# Altium PCB Counts_PCB.PcbDoc (part 2 of 3)
Units mil, origin at the board's own origin, x right, y up, seen from the top; angles counter-clockwise.
Board outline 3474.97 x 2159.98 mil, 2 copper layers (Top Layer, Bottom Layer); 185 components, 97 nets, 569 pads, 211 vias.
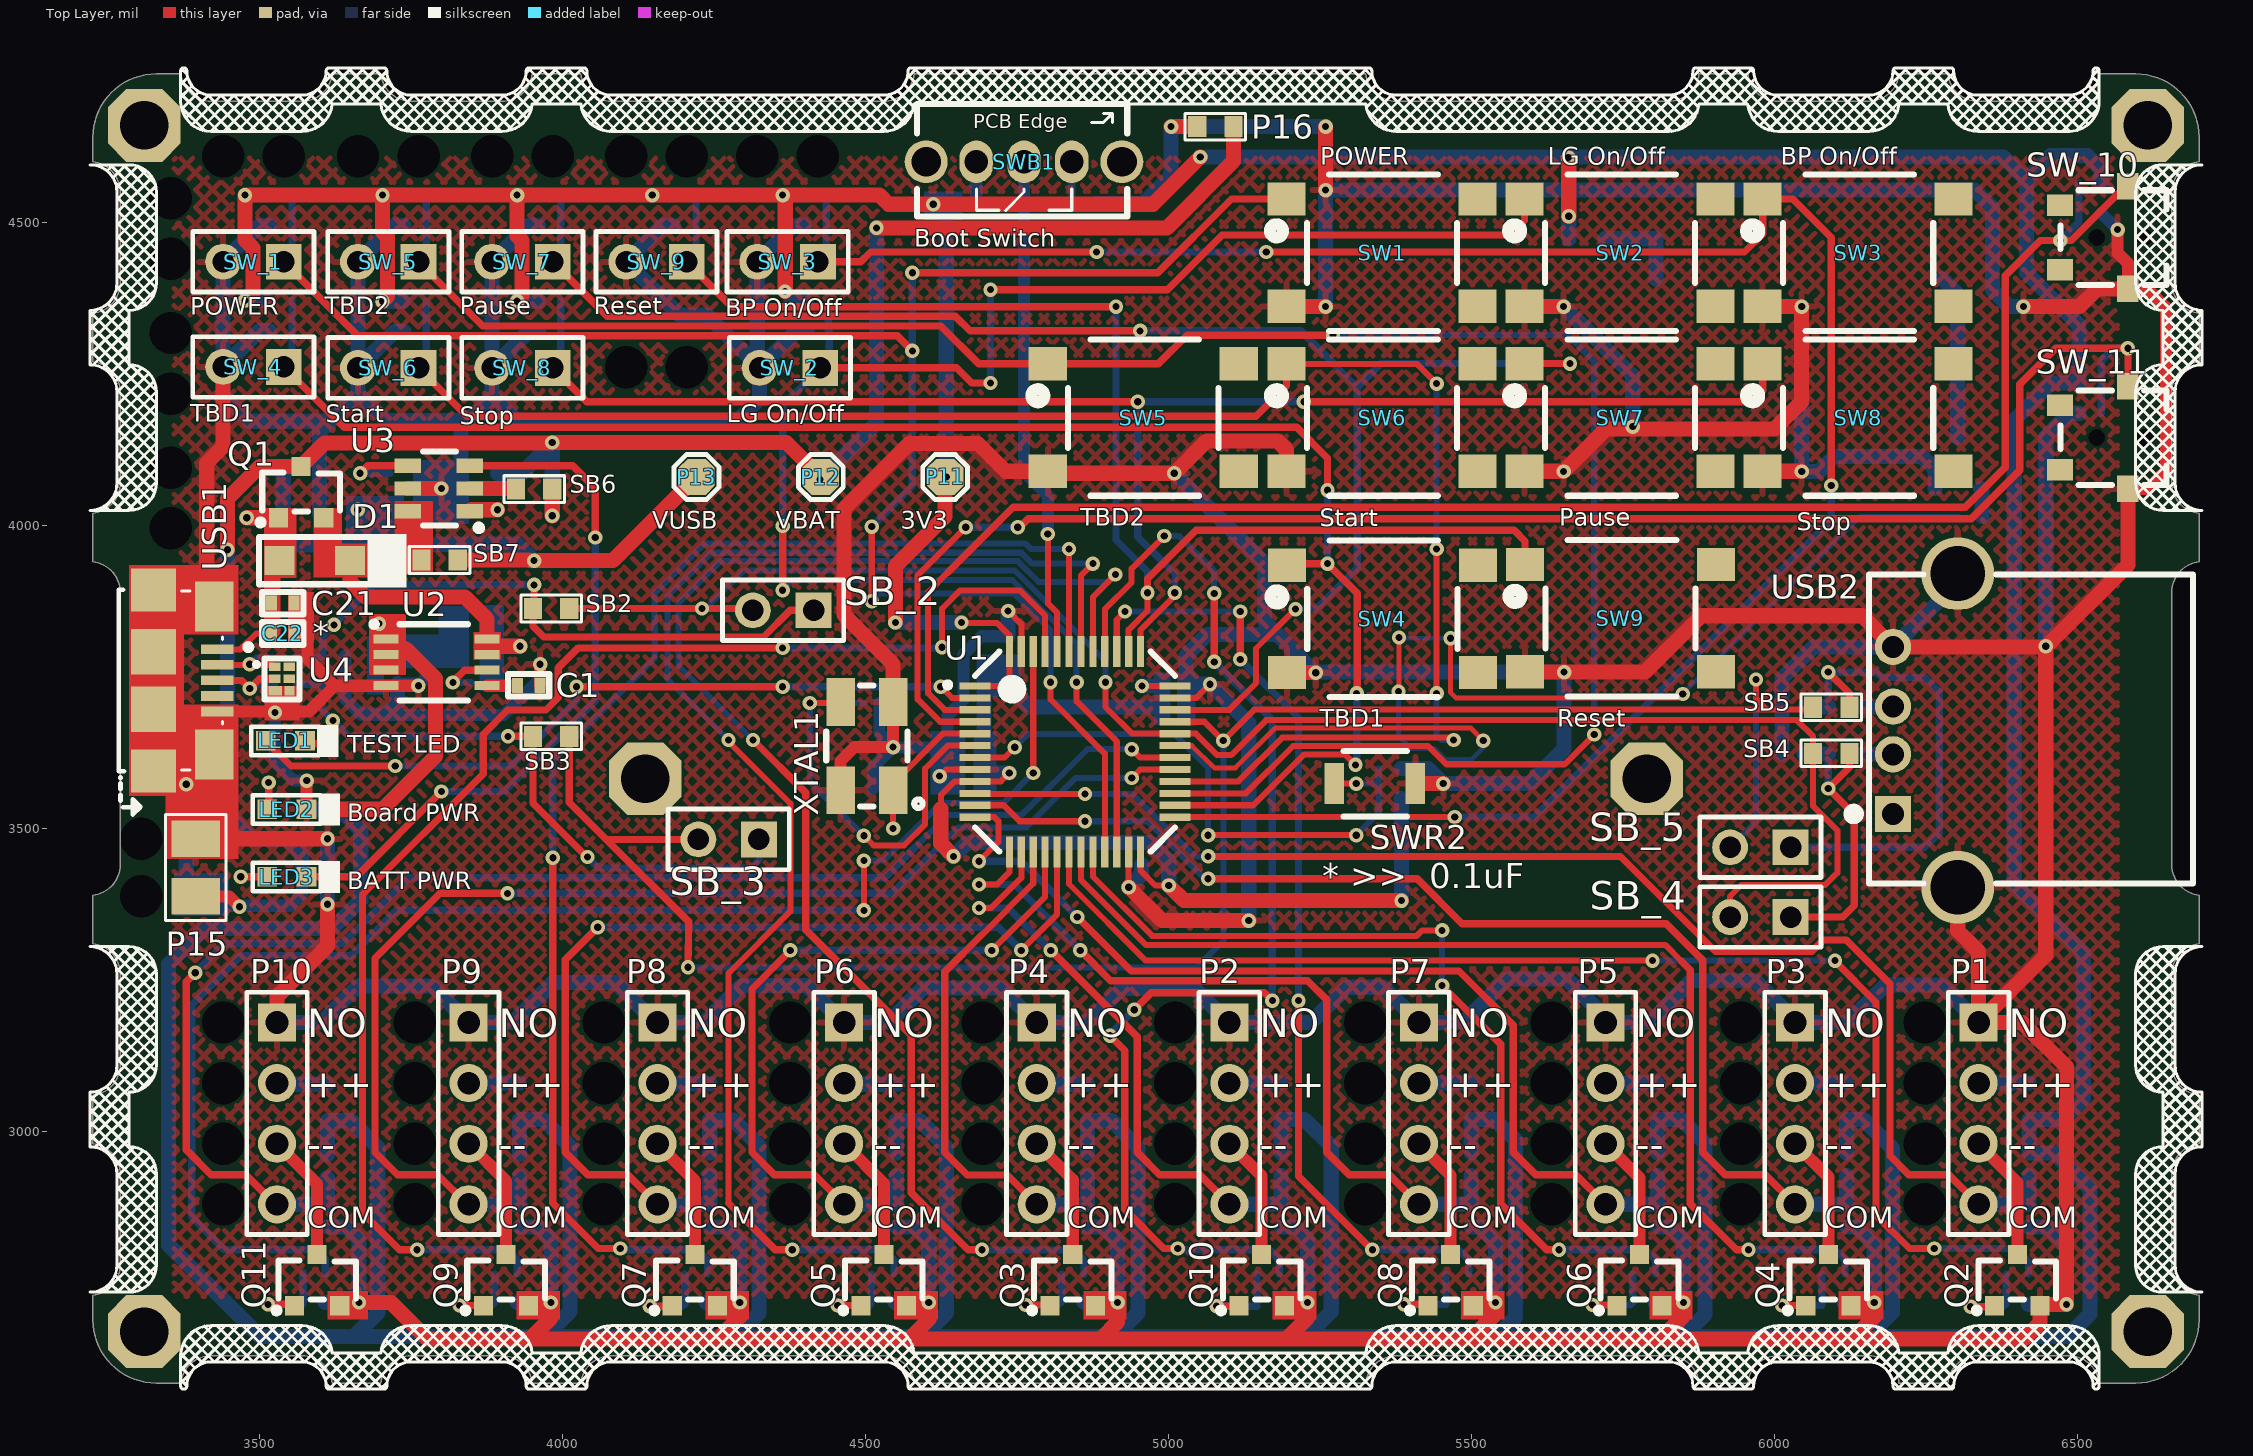
[diagram p0: Top Layer view]

## Part data (continued)
R7 R8 R9: library part RC0402JR-0720KL, "RES SMD 20K OHM 1% 1/16W 0402", Case/Package=0402, Case Code (Metric)=1005, Manufacturer=Yageo, Max Operating Temperature=155°C, Max Power Dissipation=63mW, Min Operating Temperature=-55°C, Package Quantity=1, Power Rating=62.5mW, Resistance=20kR, Supplier Part Number 1=311-20KJRCT-ND, Temperature Coefficient=100ppm/°C, Tolerance=5%, Voltage Rating=50V, Case Code (Imperial)=0402, ComponentLink1Description=https://industrial.panasonic.com/cdbs/www-data/pdf/RDA0000/AOA0000C301.pdf?src-supplier=Future+Electronics, ComponentLink1URL=https://industrial.panasonic.com/cdbs/www-data/pdf/RDA0000/AOA0000C301.pdf?src-supplier=Future+Electronics, ComponentLink2Description=http://www.jameco.com/Jameco/Products/ProdDS/1986781.pdf?src-supplier=Jameco, ComponentLink2URL=http://www.jameco.com/Jameco/Products/ProdDS/1986781.pdf?src-supplier=Jameco, ComponentLink3Description=http://www.farnell.com/datasheets/2059623.pdf?src-supplier=Farnell, ComponentLink3URL=http://www.farnell.com/datasheets/2059623.pdf?src-supplier=Farnell, ComponentLink4Description=http://industrial.panasonic.com/www-data/pdf/AOA0000/AOA0000CE1.pdf?src-supplier=Avnet, ComponentLink4URL=http://industrial.panasonic.com/www-data/pdf/AOA0000/AOA0000CE1.pdf?src-supplier=Avnet, ComponentLink5Description=http://www.alliedelec.com/m/d/51cd0790071e1666bdb9d00c57fcf960.pdf?src-supplier=Allied+Electronics, ComponentLink5URL=http://www.alliedelec.com/m/d/51cd0790071e1666bdb9d00c57fcf960.pdf?src-supplier=Allied+Electronics, ComponentLink6Description=http://industrial.panasonic.com/www-data/pdf/AOA0000/AOA0000CE1.pdf?src-supplier=Avnet+Europe, ComponentLink6URL=http://industrial.panasonic.com/www-data/pdf/AOA0000/AOA0000CE1.pdf?src-supplier=Avnet+Europe, ComponentLink7Description=http://www.farnell.com/datasheets/2059623.pdf?src-supplier=Element14, ComponentLink7URL=http://www.farnell.com/datasheets/2059623.pdf?src-supplier=Element14, ComponentLink8Description=http://industrial.panasonic.com/cdbs/www-data/pdf/RDA0000/AOA0000C301.pdf?src-supplier=Farnell, ComponentLink8URL=http://industrial.panasonic.com/cdbs/www-data/pdf/RDA0000/AOA0000C301.pdf?src-supplier=Farnell, ComponentLink9Description=http://industrial.panasonic.com/www-data/pdf/AOA0000/AOA0000CE1.pdf?src-supplier=Avnet+Asia, ComponentLink9URL=http://industrial.panasonic.com/www-data/pdf/AOA0000/AOA0000CE1.pdf?src-supplier=Avnet+Asia, ComponentLink10Description=http://www.yageo.com.tw/exep/pages/download/literatures/PYu-R_INT-thick_7.pdf?src-supplier=Digi-Key, ComponentLink10URL=http://www.yageo.com.tw/exep/pages/download/literatures/PYu-R_INT-thick_7.pdf?src-supplier=Digi-Key, ComponentLink11Description=http://www.yageo.com/NewPortal/yageodocoutput?fileName=/pdf/R-Chip/PYu-RC_51_RoHS_P_0.pdf&src-supplier=Digi-Key, ComponentLink11URL=http://www.yageo.com/NewPortal/yageodocoutput?fileName=/pdf/R-Chip/PYu-RC_51_RoHS_P_0.pdf&src-supplier=Digi-Key, ComponentLink12Description=http://www.yageo.com/documents/recent/PYu-RC0402_51_RoHS_L_6_r.pdf?src-supplier=Future+Electronics, ComponentLink12URL=http://www.yageo.com/documents/recent/PYu-RC0402_51_RoHS_L_6_r.pdf?src-supplier=Future+Electronics, ComponentLink13Description=http://www.mouser.com/ds/2/447/PYu-RC0402_51_RoHS_L_6_r-8721.pdf?src-supplier=Mouser, ComponentLink13URL=http://www.mouser.com/ds/2/447/PYu-RC0402_51_RoHS_L_6_r-8721.pdf?src-supplier=Mouser, ComponentLink14Description=http://www.yageo.com/documents/recent/PYu-RC0402_51_RoHS_L_6.pdf?src-supplier=Avnet+Europe, ComponentLink14URL=http://www.yageo.com/documents/recent/PYu-RC0402_51_RoHS_L_6.pdf?src-supplier=Avnet+Europe, ComponentLink15Description=http://www.yageo.com/documents/recent/PYu-RC_Group_51_RoHS_L_9.pdf?src-supplier=Digi-Key, ComponentLink15URL=http://www.yageo.com/documents/recent/PYu-RC_Group_51_RoHS_L_9.pdf?src-supplier=Digi-Key, ComponentLink16Description=http://www.farnell.com/datasheets/1018594.pdf?src-supplier=Element14, ComponentLink16URL=http://www.farnell.com/datasheets/1018594.pdf?src-supplier=Element14, Composition="Thick Film", Depth=0.5mm, Features="Moisture Resistant", Height=0.016inch, Lead Free="Lead Free", Length=0.039inch, Manufacturer Part Number=RC0402JR-0720KL, Military Standard=Not, Number of Pins=2, Number of Terminations=2, Packaging="Tape and Reel", Pricing 1="1=0.1, 10=0.013, 100=0.0053, 1000=0.0024, 2500=0.0021, 5000=0.0017 (USD)", REACH SVHC="No SVHC", Stock 1=4805429, Supplier 1=Digi-Key, Termination=SMD/SMT, Voltage Rating (DC)=50V, Width=0.02inch
R10 Rb: library part ERJ-2GEJ102X, "RES SMD 1K OHM 5% 1/10W 0402", Case/Package=0402, Case Code (Metric)=1005, Manufacturer=Panasonic, Max Operating Temperature=155°C, Max Power Dissipation=100mW, Min Operating Temperature=-55°C, Package Quantity=1, Resistance=1kR, Supplier Part Number 1=P1.0KJCT-ND, Temperature Coefficient=200ppm/°C, Tolerance=5%, Voltage Rating=50V, Case Code (Imperial)=0402, ComponentLink1Description=https://industrial.panasonic.com/cdbs/www-data/pdf/RDA0000/AOA0000C301.pdf?src-supplier=Future+Electronics, ComponentLink1URL=https://industrial.panasonic.com/cdbs/www-data/pdf/RDA0000/AOA0000C301.pdf?src-supplier=Future+Electronics, ComponentLink2Description=http://www.jameco.com/Jameco/Products/ProdDS/1986781.pdf?src-supplier=Jameco, ComponentLink2URL=http://www.jameco.com/Jameco/Products/ProdDS/1986781.pdf?src-supplier=Jameco, ComponentLink3Description=http://www.farnell.com/datasheets/2059623.pdf?src-supplier=Farnell, ComponentLink3URL=http://www.farnell.com/datasheets/2059623.pdf?src-supplier=Farnell, ComponentLink4Description=http://industrial.panasonic.com/www-data/pdf/AOA0000/AOA0000CE1.pdf?src-supplier=Avnet, ComponentLink4URL=http://industrial.panasonic.com/www-data/pdf/AOA0000/AOA0000CE1.pdf?src-supplier=Avnet, ComponentLink5Description=http://www.alliedelec.com/m/d/51cd0790071e1666bdb9d00c57fcf960.pdf?src-supplier=Allied+Electronics, ComponentLink5URL=http://www.alliedelec.com/m/d/51cd0790071e1666bdb9d00c57fcf960.pdf?src-supplier=Allied+Electronics, ComponentLink6Description=http://industrial.panasonic.com/www-data/pdf/AOA0000/AOA0000CE1.pdf?src-supplier=Avnet+Europe, ComponentLink6URL=http://industrial.panasonic.com/www-data/pdf/AOA0000/AOA0000CE1.pdf?src-supplier=Avnet+Europe, ComponentLink7Description=http://www.farnell.com/datasheets/2059623.pdf?src-supplier=Element14, ComponentLink7URL=http://www.farnell.com/datasheets/2059623.pdf?src-supplier=Element14, ComponentLink8Description=http://industrial.panasonic.com/cdbs/www-data/pdf/RDA0000/AOA0000C301.pdf?src-supplier=Farnell, ComponentLink8URL=http://industrial.panasonic.com/cdbs/www-data/pdf/RDA0000/AOA0000C301.pdf?src-supplier=Farnell, ComponentLink9Description=http://industrial.panasonic.com/www-data/pdf/AOA0000/AOA0000CE1.pdf?src-supplier=Avnet+Asia, ComponentLink9URL=http://industrial.panasonic.com/www-data/pdf/AOA0000/AOA0000CE1.pdf?src-supplier=Avnet+Asia, Composition="Thick Film", Contact Plating=Tin, Depth=0.5mm, Features="Automotive AEC-Q200", Height=0.35mm, Lead Free="Lead Free", Length=1mm, Manufacturer Part Number=ERJ-2GEJ102X, Military Standard=Not, Mount="Surface Mount", Number of Terminations=2, Packaging="Tape and Reel", Power Rating=100mW, Pricing 1="1=0.1, 10=0.032, 100=0.0129, 1000=0.00578, 2500=0.00502, 5000=0.00414 (USD)", Radiation Hardening=No, REACH SVHC="No SVHC", Stock 1=3855795, Supplier 1=Digi-Key, Termination=SMD/SMT, Voltage Rating (DC)=50V, Width=0.02inch, Working Voltage=50V
R31 R33 R35 R37 R39 R41 R43 R45 R47 R49: library part RC0402FR-074K7L, "RES SMD 4.7K OHM 1% 1/16W 0402", Case/Package=0402, Case Code (Metric)=1005, Manufacturer=Yageo, Max Operating Temperature=155°C, Min Operating Temperature=-55°C, Power Rating=62.5mW, Resistance=4.7kR, Supplier Part Number 1=311-4.7KLRCT-ND, Temperature Coefficient=100ppm/°C, Tolerance=1%, Voltage Rating=50V, Case Code (Imperial)=0402, ComponentLink1Description=http://www.farnell.com/datasheets/1018594.pdf?src-supplier=Element14, ComponentLink1URL=http://www.farnell.com/datasheets/1018594.pdf?src-supplier=Element14, ComponentLink2Description=https://www.verical.com/server-webapp/html/getDatasheet?partID=328119&src-supplier=Verical, ComponentLink2URL=https://www.verical.com/server-webapp/html/getDatasheet?partID=328119&src-supplier=Verical, ComponentLink3Description=http://www.farnell.com/datasheets/1686128.pdf?src-supplier=Element14, ComponentLink3URL=http://www.farnell.com/datasheets/1686128.pdf?src-supplier=Element14, Composition="Thick Film", Depth=0.5mm, Height=0.32mm, Lead Free="Lead Free", Length=1mm, Manufacturer Part Number 1=RC0402FR-074K7L, Military Standard=Not, Number of Pins=2, Packaging="Tape and Reel", Pricing 1="1=0.1, 10=0.016, 100=0.0067, 1000=0.003, 2500=0.0026, 5000=0.0022 (USD)", REACH SVHC="No SVHC", Stock 1=26143098, Supplier 1=Digi-Key, Termination=SMD/SMT, Voltage Rating (DC)=50V, Width=0.5mm
R32 R34 R36 R38 R40 R42 R44 R46 R48 R50: library part RC0402FR-0747KL, "RES SMD 47K OHM 1% 1/16W 0402", Case/Package=0402, Case Code (Metric)=1005, Manufacturer=Yageo, Max Operating Temperature=155°C, Max Power Dissipation=63mW, Min Operating Temperature=-55°C, Package Quantity=1, Power Rating=62.5mW, Resistance=47kR, Supplier Part Number 1=311-47.0KLRDKR-ND, Temperature Coefficient=100ppm/°C, Tolerance=1%, Voltage Rating=50V, Case Code (Imperial)=0402, ComponentLink1Description=http://www.yageo.com/documents/recent/PYu-RC0402_51_RoHS_L_6_r.pdf?src-supplier=Future+Electronics, ComponentLink1URL=http://www.yageo.com/documents/recent/PYu-RC0402_51_RoHS_L_6_r.pdf?src-supplier=Future+Electronics, ComponentLink2Description=http://www.farnell.com/datasheets/1018594.pdf?src-supplier=Element14, ComponentLink2URL=http://www.farnell.com/datasheets/1018594.pdf?src-supplier=Element14, ComponentLink3Description=https://www.verical.com/server-webapp/html/getDatasheet?partID=323748&src-supplier=Verical, ComponentLink3URL=https://www.verical.com/server-webapp/html/getDatasheet?partID=323748&src-supplier=Verical, ComponentLink4Description=http://www.yageo.com/documents/recent/PYu-RC_Group_51_RoHS_L_10.pdf?src-supplier=Digi-Key, ComponentLink4URL=http://www.yageo.com/documents/recent/PYu-RC_Group_51_RoHS_L_10.pdf?src-supplier=Digi-Key, Composition="Thick Film", Depth=0.5mm, Features="Moisture Resistant", Height=0.016inch, Lead Free="Lead Free", Length=1mm, Manufacturer Part Number=RC0402FR-0747KL, Military Standard=Not, Number of Terminations=2, Packaging="Tape and Reel", Pricing 1="1=0.1, 10=0.016, 100=0.0064, 1000=0.00289, 2500=0.00251, 5000=0.00207 (USD)", REACH SVHC=Unknown, Stock 1=0, Supplier 1=Digi-Key, Termination=SMD/SMT, Width=0.5mm
R51 R52 RF1 RF2: library part RT0402FRE0727RL, "RES SMD 27 OHM 1% 1/16W 0402", Case/Package=0402, Case Code (Metric)=1005, Manufacturer=Yageo, Max Operating Temperature=125°C, Max Power Dissipation=63mW, Min Operating Temperature=-55°C, Package Quantity=10000, Power Rating=62.5mW, Supplier Part Number 1=YAG3343CT-ND, Temperature Coefficient=50ppm/°C, Tolerance=1%, Voltage Rating=50V, Case Code (Imperial)=0402, ComponentLink1Description=http://www.yageo.com/NewPortal/yageodocoutput?fileName=/pdf/R-Chip/PYu-RT_1-to-0.05_RoHS_L_5.pdf&src-supplier=Digi-Key, ComponentLink1URL=http://www.yageo.com/NewPortal/yageodocoutput?fileName=/pdf/R-Chip/PYu-RT_1-to-0.05_RoHS_L_5.pdf&src-supplier=Digi-Key, ComponentLink2Description=http://www.mouser.com/ds/2/447/yageodocoutput-1125656.pdf?src-supplier=Mouser, ComponentLink2URL=http://www.mouser.com/ds/2/447/yageodocoutput-1125656.pdf?src-supplier=Mouser, Composition="Thin Film", Depth=0.5mm, Features="Moisture Resistant", Height=0.014inch, Lead Free="Lead Free", Length=1mm, Manufacturer Part Number 1=RT0402FRE0727RL, Military Standard=Not, Number of Terminations=2, Packaging="Tape and Reel", Pricing 1="1=0.1, 10=0.072, 100=0.0277, 1000=0.0122, 2500=0.0105, 5000=0.0094 (USD)", Resistance=27R, Stock 1=26946, Supplier 1=Digi-Key, Termination=SMD/SMT, Voltage Rating (DC)=50V, Width=0.02inch
SB2 SB3 SB4 SB5 SB6 SB7: "Solder Bridge ON"
SB_2 SB_3 SB_4 SB_5 SW_1 SW_2 SW_3 SW_4 SW_5 SW_6 SW_7 SW_8 SW_9: library part "Header 1x2", "CONN HEADER VERT 2POS 2.54MM", Color=Black, Current Rating=3A, Manufacturer="Wurth Electronics", Max Operating Temperature=125°C, Min Operating Temperature=-40°C, Supplier Part Number 1=732-5315-ND, Voltage Rating=250V, ComponentLink1Description=http://www.mouser.com/ds/2/445/6130xx11121-538006.pdf?src-supplier=Mouser, ComponentLink1URL=http://www.mouser.com/ds/2/445/6130xx11121-538006.pdf?src-supplier=Mouser, Connector Type="Male Pin", Contact Gender=Male, Contact Material="Copper Alloy,Copper", Contact Mating Length=0.236inch, Contact Plating=Gold, Gender=Male, Housing Material=PBT, Lead Free="Lead Free", Manufacturer Part Number=61300211121, Mount="Through Hole", Number of Contacts=2, Number of Positions=2, Number of Rows=1, Packaging=Bulk, Pitch=0.1inch, Pricing 1="1=0.13, 10=0.106, 25=0.088, 50=0.074, 100=0.067, 1000=0.061 (USD)", REACH SVHC=Unknown, Stock 1=219205, Supplier 1=Digi-Key, Termination="Through Hole"
SW1 SW2 SW3 SW4 SW5 SW6 SW7 SW8 SW9: "SWITCH TACTILE SPST-NO 0.05A 24V", Case/Package=SMD/SMT, Contact Resistance=100mR, Current Rating=50mA, Manufacturer=Omron, Max Operating Temperature=70°C, Max Voltage Rating (DC)=24V, Min Operating Temperature=-20°C, Operating Force=1.47N, Package Quantity=1, Supplier Part Number 1=SW1237CT-ND, Actuator Length=1.7mm, Actuator Type=Standard, ComponentLink1Description=https://omronfs.omron.com/en_US/ecb/products/pdf/en-b3fs.pdf?src-supplier=Digi-Key, ComponentLink1URL=https://omronfs.omron.com/en_US/ecb/products/pdf/en-b3fs.pdf?src-supplier=Digi-Key, ComponentLink2Description=http://omronfs.omron.com/en_US/ecb/products/pdf/en-b3fs.pdf?src-supplier=Digi-Key, ComponentLink2URL=http://omronfs.omron.com/en_US/ecb/products/pdf/en-b3fs.pdf?src-supplier=Digi-Key, Contact Plating=Silver, Depth=8mm, Electrical Life=300000Cycles, Illumination Type=Non-Illuminated, Length=6.3mm, Manufacturer Part Number=B3FS-1012P, Max Current Rating=50mA, Mechanical Life=300000Cycles, Mount="Surface Mount", Orientation=Straight, Packaging="Tape and Reel", Pricing 1="1=0.59, 10=0.569, 25=0.548, 100=0.4741, 250=0.43192, 500=0.40034 (USD)", Radiation Hardening=No, Stock 1=177804, Supplier 1=Digi-Key, Switch Function=Off-Mom, Switch Travel=0.25mm, Termination="Gull Wing", Throw Configuration=SPST, Voltage Rating (DC)=24V, Weight=0.2g
SW_10 SW_11: "SWITCH DETECTOR SPST-NC 10MA 5V", Contact Current Rating=10mA, Contact Resistance=500mR, Manufacturer=Panasonic, Max Operating Temperature=60°C, Max Voltage Rating (DC)=5V, Min Operating Temperature=-10°C, Operating Force=0.3N, Operating Position=0.102inch, Package Quantity=1, Supplier Part Number 1=P13373SCT-ND, Actuator Length=2.15mm, Actuator Type=Lever, ComponentLink1Description=https://industrial.panasonic.com/cdbs/www-data/pdf/ATB0000/ATB0000C8.pdf?src-supplier=Digi-Key, ComponentLink1URL=https://industrial.panasonic.com/cdbs/www-data/pdf/ATB0000/ATB0000C8.pdf?src-supplier=Digi-Key, ComponentLink2Description=http://www.farnell.com/datasheets/1520574.pdf?src-supplier=Newark, ComponentLink2URL=http://www.farnell.com/datasheets/1520574.pdf?src-supplier=Newark, ComponentLink3Description=https://www.distrelec.biz/Web/Downloads/_t/ds/ese18_eng_tds.pdf?mime=application%2Fpdf&src-supplier=Distrelec, ComponentLink3URL=https://www.distrelec.biz/Web/Downloads/_t/ds/ese18_eng_tds.pdf?mime=application%2Fpdf&src-supplier=Distrelec, ComponentLink4Description=http://www.farnell.com/datasheets/1728953.pdf?src-supplier=Element14, ComponentLink4URL=http://www.farnell.com/datasheets/1728953.pdf?src-supplier=Element14, Current Rating=10mA, Electrical Life=50000Cycles, Height=1.2mm, Lead Free="Lead Free", Manufacturer Part Number=ESE-18R61D, Mechanical Life=50000Cycles, Mount="Surface Mount", Number of Terminals=2, Orientation="Right Angle", Packaging="Tape and Reel", Pricing 1="1=1, 10=0.962, 25=0.8992, 100=0.7807, 250=0.7104, 500=0.6586, 1000=0.6105, 2500=0.555 (USD)", REACH SVHC="No SVHC", Stock 1=39873, Supplier 1=Digi-Key, Switch Function=On-Mom, Termination=SMD/SMT, Throw Configuration=SPST, Voltage Rating (DC)=5V, Width=4mm
SWB1: "2 Position SPDT Miniature Slide Switch 100MA 12V Through Hole, Right Angle", Contact Current Rating=100mA, Contact Resistance=20mR, Insulation Resistance=100MR, Manufacturer="ITT C&K", Max Operating Temperature=70°C, Max Voltage Rating (DC)=12V, Min Operating Temperature=-10°C, Package Quantity=300, Supplier Part Number 1=CKN9559-ND, Actuator Length=4mm, Actuator Material=Polyoxymethylene,Acetal,Polyacetal, Actuator Type=Standard, Body Material=Tin, ComponentLink1Description=http://www.jameco.com/Jameco/Products/ProdDS/588220.pdf?src-supplier=Jameco, ComponentLink1URL=http://www.jameco.com/Jameco/Products/ProdDS/588220.pdf?src-supplier=Jameco, ComponentLink2Description=http://uk.rs-online.com/webdocs/1263/0900766b81263f61.pdf?src-supplier=RSComponents, ComponentLink2URL=http://uk.rs-online.com/webdocs/1263/0900766b81263f61.pdf?src-supplier=RSComponents, ComponentLink3Description=http://www.farnell.com/datasheets/1683358.pdf?src-supplier=Element14, ComponentLink3URL=http://www.farnell.com/datasheets/1683358.pdf?src-supplier=Element14, ComponentLink4Description=http://www1.futureelectronics.com/doc/C%20-%20K%20COMPONENTS/OS102011MA1QN1.pdf?src-supplier=Future+Electronics, ComponentLink4URL=http://www1.futureelectronics.com/doc/C%20-%20K%20COMPONENTS/OS102011MA1QN1.pdf?src-supplier=Future+Electronics, ComponentLink5Description=https://www.ckswitches.com/media/1428/os.pdf?src-supplier=Digi-Key, ComponentLink5URL=https://www.ckswitches.com/media/1428/os.pdf?src-supplier=Digi-Key, ComponentLink6Description=https://www.alliedelec.com/m/d/08271ccc8b1809c6b911a7d3c93f3e8a.pdf?src-supplier=Allied+Electronics, ComponentLink6URL=https://www.alliedelec.com/m/d/08271ccc8b1809c6b911a7d3c93f3e8a.pdf?src-supplier=Allied+Electronics, ComponentLink7Description=http://www.farnell.com/datasheets/2674787.pdf?src-supplier=Newark, ComponentLink7URL=http://www.farnell.com/datasheets/2674787.pdf?src-supplier=Newark, Contact Material="Copper Alloy,Brass,Silver", Contact Plating=Silver,Gold, Contact Style=Non-Shorting, Current Rating=100mA, Depth=8.4mm, Electrical Life=10000Cycles, Housing Material=Resin, Lead Free="Lead Free", Length=8.6mm, Manufacturer Part Number=OS102011MA1QN1, Max Current Rating=100mA, Mechanical Life=10000Cycles, Mount="Through Hole,Brackets,PCB", Orientation="Right Angle", Packaging=Bulk, Pricing 1="1=0.38, 10=0.363, 25=0.3552, 50=0.3176, 100=0.3024, 250=0.2948, 500=0.2495, 1000=0.2419, 5000=0.2117 (USD)", Radiation Hardening=No, REACH SVHC="No SVHC", Stock 1=24069, Supplier 1=Digi-Key, Switch Function=On-On, Switch Travel=2mm, Termination="PC Pins", Throw Configuration=SPDT, Voltage Rating (DC)=12V, Width=4.4mm
SWR2: "SWITCH TACTILE SPST-NO 0.05A 12V", Contact Current Rating=50mA, Contact Resistance=100mR, Insulation Resistance=100MR, Manufacturer=Omron, Max Operating Temperature=70°C, Max Voltage Rating (DC)=12V, Min Operating Temperature=-25°C, Operating Force=1.5N, Package Quantity=1, Ratings="Dust Proof,IP40", Supplier Part Number 1=SW1020DKR-ND, Actuator Length=0.4mm, Actuator Type=Standard, ComponentLink1Description=http://www.farnell.com/datasheets/60838.pdf?src-supplier=Farnell, ComponentLink1URL=http://www.farnell.com/datasheets/60838.pdf?src-supplier=Farnell, ComponentLink2Description=http://www.farnell.com/datasheets/60838.pdf?src-supplier=Element14, ComponentLink2URL=http://www.farnell.com/datasheets/60838.pdf?src-supplier=Element14, ComponentLink3Description=https://omronfs.omron.com/en_US/ecb/products/pdf/en-b3u.pdf?src-supplier=Digi-Key, ComponentLink3URL=https://omronfs.omron.com/en_US/ecb/products/pdf/en-b3u.pdf?src-supplier=Digi-Key, ComponentLink4Description=http://www.omron.com/ecb/products/pdf/en-b3u.pdf?src-supplier=Digi-Key, ComponentLink4URL=http://www.omron.com/ecb/products/pdf/en-b3u.pdf?src-supplier=Digi-Key, ComponentLink5Description=https://www.distrelec.biz/Web/Downloads/he/et/B3U_eng_datasheet.pdf?mime=application%2Fpdf&src-supplier=Distrelec, ComponentLink5URL=https://www.distrelec.biz/Web/Downloads/he/et/B3U_eng_datasheet.pdf?mime=application%2Fpdf&src-supplier=Distrelec, ComponentLink6Description=http://www.onlinecomponents.com/productFiles/mf-OM/en-b3u.pdf?src-supplier=Onlinecomponents.com, ComponentLink6URL=http://www.onlinecomponents.com/productFiles/mf-OM/en-b3u.pdf?src-supplier=Onlinecomponents.com, ComponentLink7Description=https://www.verical.com/server-webapp/html/getDatasheet?partID=552554&src-supplier=Verical, ComponentLink7URL=https://www.verical.com/server-webapp/html/getDatasheet?partID=552554&src-supplier=Verical, ComponentLink8Description=http://www.farnell.com/datasheets/1685550.pdf?src-supplier=Element14, ComponentLink8URL=http://www.farnell.com/datasheets/1685550.pdf?src-supplier=Element14, ComponentLink9Description=http://www.farnell.com/datasheets/2610940.pdf?src-supplier=Farnell, ComponentLink9URL=http://www.farnell.com/datasheets/2610940.pdf?src-supplier=Farnell, ComponentLink10Description=https://www.alliedelec.com/m/d/4c8a9ef82804fc3c241a13c1e298fd73.pdf?src-supplier=Allied+Electronics, ComponentLink10URL=https://www.alliedelec.com/m/d/4c8a9ef82804fc3c241a13c1e298fd73.pdf?src-supplier=Allied+Electronics, Contact Material=Silver, Current Rating=50mA, Depth=2.5mm, Electrical Life=200000Cycles, Height=1.2mm, Illumination Type=Non-Illuminated,Illuminated, Lead Free="Lead Free", Length=4mm, Manufacturer Part Number=B3U-1000P, Max Current Rating=50mA, Mechanical Life=200000Cycles, Mount="Surface Mount", Orientation=Straight, Packaging="Tape and Reel", Pricing 1="1=1, 10=0.961, 25=0.9064, 50=0.7976, 100=0.7251, 250=0.68888, 500=0.67074, 1000=0.52571 (USD)", REACH SVHC=Unknown, Stock 1=116454, Supplier 1=Digi-Key, Switch Function=Off-Mom, Switch Travel=0.15mm, Termination=SMD/SMT, Throw Configuration=SPST, Voltage Rating (DC)=12V, Weight=0.000776oz, Width=3mm
U1: "IC MCU 32BIT 128KB FLASH 48LQFP"
U2: "IC REG LINEAR 3.3V 500MA MICRO8", Case/Package=MSOP, Dropout Voltage=340mV, Manufacturer="ON Semiconductor", Max Input Voltage=16V, Max Operating Temperature=150°C, Max Output Current=800mA, Min Input Voltage=2.6V, Min Operating Temperature=-40°C, Min Output Voltage=3.3V, Output Voltage Accuracy=0.9%, Package Quantity=4000, Reference Voltage=1.269V, Supplier Part Number 1=NCP3335ADM330R2GOSCT-ND, Accuracy=0.9%, ComponentLink1Description=http://www.onsemi.com/pub_link/Collateral/NCP3335A-D.PDF?src-supplier=Future+Electronics, ComponentLink1URL=http://www.onsemi.com/pub_link/Collateral/NCP3335A-D.PDF?src-supplier=Future+Electronics, ComponentLink2Description=http://www.onsemi.com/pub/Collateral/NCP3335A-D.PDF?src-supplier=Digi-Key, ComponentLink2URL=http://www.onsemi.com/pub/Collateral/NCP3335A-D.PDF?src-supplier=Digi-Key, Halogen Free="Halogen Free", Height=0.95mm, Lead Free="Lead Free", Length=3.1mm, Manufacturer Part Number=NCP3335ADM330R2G, Mount="Surface Mount", Number of Outputs=1, Number of Pins=8, Number of Regulators=1, Output Current=800mA, Output Type=Fixed, Output Voltage=3.3V, Packaging="Tape and Reel", Polarity=Positive, Pricing 1="1=1.12, 10=1.003, 25=0.952, 100=0.731, 250=0.646, 500=0.612, 1000=0.476 (USD)", Radiation Hardening=No, Stock 1=2299, Supplier 1=Digi-Key, Width=3.1mm
U3: "IC BAT CHG LI-ION 1 CELL SOT23-6", Manufacturer="Texas Instruments", Supplier Part Number 1=296-47315-1-ND, Lead Free="Lead Free", Manufacturer Part Number=BQ21040DBVR, Number of Cells=1, Pricing 1="1=1.14, 10=1.015, 100=0.7912, 500=0.65364, 1000=0.51603 (USD)", Stock 1=10857, Supplier 1=Digi-Key
U4: "TVS DIODE 5V 6.8V 6UDFN", Capacitance=1E-12F, Clamping Voltage=6.8V, Manufacturer=Littelfuse, Max Operating Temperature=125°C, Max Surge Current=8A, Min Operating Temperature=-40°C, Package Quantity=3000, Power Line Protection=Yes, Reverse Standoff Voltage=5V, Supplier Part Number 1=F6501DKR-ND, ComponentLink1Description=http://www.mouser.com/ds/2/240/Littelfuse_TVS_Diode_Array_SP3014_Datasheet.pdf-364113.pdf?src-supplier=Mouser, ComponentLink1URL=http://www.mouser.com/ds/2/240/Littelfuse_TVS_Diode_Array_SP3014_Datasheet.pdf-364113.pdf?src-supplier=Mouser, ComponentLink2Description=https://www.littelfuse.com/~/media/electronics/datasheets/tvs_diode_arrays/littelfuse_tvs_diode_array_sp3014_datasheet.pdf.pdf?src-supplier=Digi-Key, ComponentLink2URL=https://www.littelfuse.com/~/media/electronics/datasheets/tvs_diode_arrays/littelfuse_tvs_diode_array_sp3014_datasheet.pdf.pdf?src-supplier=Digi-Key, ComponentLink3Description=http://www.littelfuse.com/~/media/electronics/datasheets/tvs_diode_arrays/littelfuse_tvs_diode_array_sp3014_datasheet.pdf.pdf?src-supplier=Digi-Key, ComponentLink3URL=http://www.littelfuse.com/~/media/electronics/datasheets/tvs_diode_arrays/littelfuse_tvs_diode_array_sp3014_datasheet.pdf.pdf?src-supplier=Digi-Key, ComponentLink4Description=http://www.farnell.com/datasheets/2291833.pdf?src-supplier=Element14, ComponentLink4URL=http://www.farnell.com/datasheets/2291833.pdf?src-supplier=Element14, ComponentLink5Description=http://www.farnell.com/datasheets/2291833.pdf?src-supplier=Farnell, ComponentLink5URL=http://www.farnell.com/datasheets/2291833.pdf?src-supplier=Farnell, ComponentLink6Description=http://www.farnell.com/datasheets/2291833.pdf?src-supplier=Newark, ComponentLink6URL=http://www.farnell.com/datasheets/2291833.pdf?src-supplier=Newark, Height=0.55mm, Length=1.65mm, Manufacturer Part Number=SP3014-02UTG, Mount="Surface Mount", Number of Bidirectional Channels=2, Number of Channels=2, Number of Pins=6, Packaging="Tape and Reel", Peak Pulse Current=8A, Polarity=Unidirectional, Pricing 1="1=0.56, 10=0.495, 25=0.4652, 100=0.3375, 250=0.32552, 500=0.282, 1000=0.24 (USD)", Stock 1=3888, Supplier 1=Digi-Key, Termination=SMD/SMT, Width=1.05mm, Working Voltage=5V
USB1: "CONN USB MICRO B RECPT SMT R/A", Colour=Black, Current Rating=1.8A, Flammability Rating="UL94 V-0", Insulation Resistance=1GR, Manufacturer="Amphenol FCI", Max Operating Temperature=85°C, Max Voltage Rating (AC)=100V, Min Operating Temperature=-55°C, Package Quantity=1400, Supplier Part Number 1=609-4613-1-ND, ComponentLink1Description=https://datasheet.ciiva.com/26853/getdatasheetpartid-418041-26853891.pdf, ComponentLink1URL=https://datasheet.ciiva.com/26853/getdatasheetpartid-418041-26853891.pdf, ComponentLink2Description=https://datasheet.ciiva.com/851/10118192-851112.pdf, ComponentLink2URL=https://datasheet.ciiva.com/851/10118192-851112.pdf, ComponentLink3Description=https://datasheet.ciiva.com/4598/10118192ac-197249-4598796.pdf, ComponentLink3URL=https://datasheet.ciiva.com/4598/10118192ac-197249-4598796.pdf, Connector Type=USB,Receptacle, Contact Material="Copper Alloy", Contact Plating=Nickel,Gold, Depth=5.57mm, Gender=Receptacle, Housing Material=Polymer, Lead Free="Lead Free", Length=7.86mm, Manufacturer Part Number=10118192-0001LF, Mount="Surface Mount,Horizontal", Number of Contacts=5, Number of Ports=1, Number of Terminals=5, Orientation="Right Angle", Packaging="Tape and Reel", Pitch=0.65mm, Pricing 1="1=0.42, 10=0.393, 25=0.3536, 50=0.3144, 100=0.3013, 250=0.2751, 500=0.262 (USD)", Radiation Hardening=No, REACH SVHC="No SVHC", Stock 1=203283, Supplier 1=Digi-Key, Termination=Solder, USB Standard="USB 2.0", Voltage Rating=100V
USB2: "USB-A (USB TYPE-A) USB 2.0 Receptacle Connector 4 Position Through Hole, Right Angle", Color=Black, Contact Current Rating=1A, Flammability Rating="UL94 V-0", Insulation Resistance=1GR, Manufacturer="TE Connectivity", Max Operating Temperature=185°C, Min Operating Temperature=-67°C, Package Quantity=30, Supplier Part Number 1=A31726-ND, Voltage Rating (AC)=30V, Approvals=UL, Circuit Application=Signal, ComponentLink1Description=http://www.farnell.com/datasheets/1699414.pdf?src-supplier=Farnell, ComponentLink1URL=http://www.farnell.com/datasheets/1699414.pdf?src-supplier=Farnell, ComponentLink2Description=http://www.te.com/commerce/DocumentDelivery/DDEController?Action=showdoc&DocId=Data+Sheet%7F1-1773453-6%7F0908%7Fpdf%7FEnglish%7FENG_DS_1-1773453-6_0908.pdf&src-supplier=Avnet, ComponentLink2URL=http://www.te.com/commerce/DocumentDelivery/DDEController?Action=showdoc&DocId=Data+Sheet%7F1-1773453-6%7F0908%7Fpdf%7FEnglish%7FENG_DS_1-1773453-6_0908.pdf&src-supplier=Avnet, ComponentLink3Description=http://www.te.com/commerce/DocumentDelivery/DDEController?Action=showdoc&DocId=Data+Sheet1-1773453-60908pdfEnglishENG_DS_1-1773453-6_0908.pdf&src-supplier=Avnet+Asia, ComponentLink3URL=http://www.te.com/commerce/DocumentDelivery/DDEController?Action=showdoc&DocId=Data+Sheet1-1773453-60908pdfEnglishENG_DS_1-1773453-6_0908.pdf&src-supplier=Avnet+Asia, ComponentLink4Description=https://www.te.com/commerce/DocumentDelivery/DDEController?Action=srchrtrv&DocNm=292303&DocType=Customer+Drawing&DocLang=English&src-supplier=Digi-Key, ComponentLink4URL=https://www.te.com/commerce/DocumentDelivery/DDEController?Action=srchrtrv&DocNm=292303&DocType=Customer+Drawing&DocLang=English&src-supplier=Digi-Key, ComponentLink5Description=http://www.farnell.com/datasheets/1699414.pdf?src-supplier=Element14, ComponentLink5URL=http://www.farnell.com/datasheets/1699414.pdf?src-supplier=Element14, ComponentLink6Description=http://www.farnell.com/cad/1699210.pdf?src-supplier=Element14, ComponentLink6URL=http://www.farnell.com/cad/1699210.pdf?src-supplier=Element14, ComponentLink7Description=https://www.alliedelec.com/m/d/b8ff6cd1157c72c7c4c41b4704d2a2e6.pdf?src-supplier=Allied+Electronics, ComponentLink7URL=https://www.alliedelec.com/m/d/b8ff6cd1157c72c7c4c41b4704d2a2e6.pdf?src-supplier=Allied+Electronics, ComponentLink8Description=http://www.te.com/commerce/DocumentDelivery/DDEController?Action=showdoc&DocId=Data+Sheet%7F1-1773453-6%7F0908%7Fpdf%7FEnglish%7FENG_DS_1-1773453-6_0908.pdf&src-supplier=Avnet+Europe, ComponentLink8URL=http://www.te.com/commerce/DocumentDelivery/DDEController?Action=showdoc&DocId=Data+Sheet%7F1-1773453-6%7F0908%7Fpdf%7FEnglish%7FENG_DS_1-1773453-6_0908.pdf&src-supplier=Avnet+Europe, ComponentLink9Description=https://www.distrelec.biz/Web/Downloads/07/08/04270708.pdf?mime=application%2Fpdf&src-supplier=Distrelec, ComponentLink9URL=https://www.distrelec.biz/Web/Downloads/07/08/04270708.pdf?mime=application%2Fpdf&src-supplier=Distrelec, ComponentLink10Description=http://www.jameco.com/Jameco/Products/ProdDS/921651.pdf?src-supplier=Jameco, ComponentLink10URL=http://www.jameco.com/Jameco/Products/ProdDS/921651.pdf?src-supplier=Jameco, ComponentLink11Description=http://www.onlinecomponents.com/productFiles/mf-AMP/ddecontrolleractionsrchrtrvdocnm117734536doctypedsdoclan.pdf?src-supplier=Onlinecomponents.com, ComponentLink11URL=http://www.onlinecomponents.com/productFiles/mf-AMP/ddecontrolleractionsrchrtrvdocnm117734536doctypedsdoclan.pdf?src-supplier=Onlinecomponents.com, ComponentLink12Description=http://www.te.com/commerce/DocumentDelivery/DDEController?Action=showdoc&DocId=Customer+Drawing%7F292303%7FE7%7Fpdf%7FEnglish%7FENG_CD_292303_E7.pdf%7F292303-1&src-supplier=Future+Electronics, ComponentLink12URL=http://www.te.com/commerce/DocumentDelivery/DDEController?Action=showdoc&DocId=Customer+Drawing%7F292303%7FE7%7Fpdf%7FEnglish%7FENG_CD_292303_E7.pdf%7F292303-1&src-supplier=Future+Electronics, Connector System=Cable-to-Board, Connector Type=Receptacle, Contact Material="Copper Alloy,Copper", Contact Plating=Gold, Current Rating=1A, Depth=14mm, Gender=Receptacle, Halogen Free="Halogen Free", Housing Color=Black, Housing Material=Thermoplastic, Length=14.63mm, Manufacturer Part Number=292303-1, Mount="Through Hole,Horizontal", Number of Contacts=4, Number of Ports=1, Number of Positions=4, Number of Terminals=4, Orientation="Right Angle", Packaging=Rail/Tube, PCB Thickness=0.062inch, Pitch=2.5mm, Plating=Bright,Tin, Plating Thickness=0.76um, Pricing 1="1=1.49, 10=1.354, 25=1.2716, 50=1.2162, 100=1.161, 250=1.0504, 500=0.96748, 1000=0.82926, 2500=0.77398 (USD)", REACH SVHC="No SVHC", Stock 1=19088, Supplier 1=Digi-Key, Tail Length=0.112inch, Termination="Through Hole", USB Standard="USB 2.0"
XTAL1: library part 7B08070001, "CRYSTAL 8.0000MHZ 18PF SMD", Case/Package=SMD/SMT, Frequency=8MHz, Frequency Stability=20ppm, Load Capacitance=18pF, Manufacturer=TXC, Max Operating Temperature=75°C, Min Operating Temperature=-20°C, Supplier Part Number 1=7B08070001-ND, ComponentLink1Description=http://www.txccorp.com/download/products/quartz_crystals/2015TXC_7B_19.pdf?src-supplier=Digi-Key, ComponentLink1URL=http://www.txccorp.com/download/products/quartz_crystals/2015TXC_7B_19.pdf?src-supplier=Digi-Key, ComponentLink2Description=http://www.mouser.com/ds/2/417/7b-5226.pdf?src-supplier=Mouser, ComponentLink2URL=http://www.mouser.com/ds/2/417/7b-5226.pdf?src-supplier=Mouser, Frequency Tolerance=20ppm, Height=0.041inch, Length=0.197inch, Manufacturer Part Number=7B08070001, Mount="Surface Mount", Pricing 1="1000=0.39 (USD)", Stock 1=0, Supplier 1=Digi-Key, Width=0.126inch

## Free pads (board coordinates)
  round 0 hole 70 unplated: 3(3304.79,3388.01) 3(3304.79,3483.01) 3(3353.89,3995.06) 3(3353.89,4095.06) 3(3353.89,4217.56) 3(3353.89,4317.56) 3(3353.89,4440.06) 3(3353.89,4540.06) 3(3440,2880) 3(3440,2980) 3(3440,3080) 3(3440,3180) 3(3440,4608.89) 3(3540,4608.89) 3(3662.5,4608.89) 3(3756.11,2880) 3(3756.11,2980) 3(3756.11,3080) 3(3756.11,3180) 3(3762.5,4608.89) 3(3883.75,4608.89) 3(3983.75,4608.89) 3(4067.78,2880) 3(4067.78,2980) 3(4067.78,3080) 3(4067.78,3180) 3(4105,4261.11) 3(4105,4608.89) 3(4205,4261.11) 3(4205,4608.89) 3(4321.25,4608.89) 3(4375.56,2880) 3(4375.56,2980) 3(4375.56,3080) 3(4375.56,3180) 3(4421.25,4608.89) 3(4693.33,2880) 3(4693.33,2980) 3(4693.33,3080) 3(4693.33,3180) 3(5011.11,2880) 3(5011.11,2980) 3(5011.11,3080) 3(5011.11,3180) 3(5323.89,2880) 3(5323.89,2980) 3(5323.89,3080) 3(5323.89,3180) 3(5631.67,2880) 3(5631.67,2980) 3(5631.67,3080) 3(5631.67,3180) 3(5944.44,2880) 3(5944.44,2980) 3(5944.44,3080) 3(5944.44,3180) 3(6247.22,2880) 3(6247.22,2980) 3(6247.22,3080) 3(6247.22,3180)
  oct 120x120 hole 80: MH(3310,2670) MH(3310,4660) MH(4136.18,3582.19) MH(5788.54,3582.19) MH(6615,2670) MH(6615,4660)

## Via types
v1: diameter 23.62, hole 11.81, Top Layer to Bottom Layer, 211 vias

## Nets (pads, with @x,y where several pads share a name; then routed paths per layer and width w, separated by ;. In a path a pad name is that pad's centre, name@x,y a point inside that pad or via, vN(x,y) a via of type N, cw(c..) or ccw(c..) an arc to the next point about the centre after c; other vN are vias at no path point)
\S\D\: R2.1 U2.6 | length 96.3
  Top Layer w12: v1(3819,3741) 3819,3742 3838.2,3761.2 U2.6@3875.46,3761.2
  Bottom Layer w12: v1(3819,3741) 3848.5,3741 R2.1@3849.5,3740
ACT1: C111.1 P1.4 R11.1 U1.10 | length 2250.1
  Top Layer w10: U1.10@4680,3558.03 4681.13,3556.91 v1(4862,3556.91)
  Top Layer w12: v1(5065,3454) 5745.22,3454 5902.22,3297 6061,3297 6080,3316 6118,3316 6190,3244 6190,2960 6221,2929 6287.11,2929 P1.4@6336.11,2880
  Bottom Layer w10: v1(4862,3556.91) 4940.3,3556.91 5043.2,3454 v1(5065,3454)
  Bottom Layer w25: P1.4@6336.11,2880 C111.1@6419,2880 ; C111.1@6418.75,2879.5 6419,2879.75 C111.1@6419,2880 ; R11.1@6419,2927.5 C111.1@6419,2880
ACT2: C112.1 P3.4 R13.1 U1.11 | length 1938.6
  Top Layer w10: U1.11@4680,3538.35 4727.65,3538.35 4754,3512 v1(4862,3512)
  Top Layer w12: v1(5065,3417) 5410,3417 5484,3343 5821,3343 5881.22,3282.78 5881.22,2966 5918.22,2929 5984.33,2929 P3.4@6033.33,2880
  Bottom Layer w10: v1(4862,3512) 4964.86,3512 4978.2,3498.66 4978.74,3498.66 5021.5,3455.91 5021.5,3455.36 v1@5058.86,3418
  Bottom Layer w25: P3.4@6033.33,2880 6118.08,2880 C112.1@6118.33,2879.75 ; R13.1@6118.33,2927.5 C112.1@6118.33,2879.75 ; C112.1@6118.58,2879.5 C112.1@6118.33,2879.75
ACT3: C113.1 P5.4 R15.1 U1.12 | length 1645.8
  Top Layer w10: U1.12@4680,3518.66 4712.34,3518.66 4719,3512 4719,3478 v1(4687,3446)
  Top Layer w12: v1(4849,3354) 4938,3265 5479,3265 5568.44,3175.56 5568.44,2966 5605.44,2929 5671.56,2929 P5.4@5720.56,2880
  Bottom Layer w12: v1(4687,3446) 4757,3446 v1(4849,3354)
  Bottom Layer w25: P5.4@5720.56,2880 5805.81,2880 C113.1@5806.31,2879.5 5806.56,2879.75 R15.1@5806.56,2927.5
ACT4: C114.1 P7.4 R17.1 U1.13 | length 1317.7
  Top Layer w10: v1(4687,3407.5) 4716.5,3407.5 4737.09,3428.09 U1.13@4737.09,3461.57
  Top Layer w12: v1(4854,3299) 4904,3249 5229,3249 5260.67,3217.33 5260.67,2966 5297.67,2929 5363.78,2929 P7.4@5412.78,2880
  Bottom Layer w12: v1(4687,3407.5) 4745.5,3407.5 v1(4854,3299)
  Bottom Layer w25: P7.4@5412.78,2880 5498.03,2880 C114.1@5498.53,2879.5 5498.78,2879.75 R17.1@5498.78,2927.5
ACT5: C115.1 P2.4 R19.1 U1.14 | length 991.7
  Top Layer w10: v1(4687,3369) 4707,3369 4756.77,3418.77 U1.14@4756.77,3461.57
  Top Layer w12: v1(4805.33,3299) 4947.89,3156.44 4947.89,2966 4984.89,2929 5051,2929 P2.4@5100,2880
  Bottom Layer w12: v1(4687,3369) 4735.33,3369 v1(4805.33,3299)
  Bottom Layer w25: P2.4@5100,2880 C115.1@5183.25,2880 ; R19.1@5185,2927.5 5185,2879.75 C115.1@5185.25,2879.5
ACT6: C116.1 P4.4 R21.1 U1.15 | length 876.3
  Top Layer w10: 4692,3325 4776.46,3409.46 U1.15@4776.46,3461.57
  Top Layer w12: 4692,3325 4630.61,3263.61 4630.61,2965.5 4667.61,2928.5 4733.72,2928.5 P4.4@4782.22,2880 P4.4@4782.72,2879.5
  Bottom Layer w25: P4.4@4782.22,2880 4782.72,2879.5 C116.1@4865.97,2879.5 4866.22,2879.75 R21.1@4866.22,2927.5
ACT7: C117.1 P6.4 R23.1 U1.16 | length 1212.9
  Top Layer w10: v1(4708,3299) 4796.14,3387.14 U1.16@4796.14,3461.57
  Top Layer w12: v1@4375.78,3298.78 4312.33,3235.33 4312.33,2966 4349.33,2929 4415.44,2929 P6.4@4464.44,2880
  Bottom Layer w12: v1(4375.56,3299) v1(4708,3299)
  Bottom Layer w25: P6.4@4464.44,2880 4464.94,2879.5 C117.1@4550.69,2879.5 4550.44,2879.75 R23.1@4550.44,2927.5
ACT8: C118.1 P8.4 R25.1 U1.17 | length 1613.2
  Top Layer w10: v1(4756.67,3299) 4816,3358.33 U1.17@4816,3457.75
  Top Layer w12: v1(4058,3337) 4004.56,3283.56 4004.56,2966 4041.56,2929 4107.67,2929 P8.4@4156.67,2880
  Bottom Layer w12: v1(4058,3337) 4718.67,3337 v1(4756.67,3299)
  Bottom Layer w25: P8.4@4156.67,2880 4157.17,2879.5 C118.1@4242.92,2879.5 4242.67,2879.75 R25.1@4242.67,2927.5
ACT9: C119.1 P9.4 R27.1 U1.29 | length 2087.3
  Top Layer w10: v1(4938.89,3583.49) 4952.8,3597.4 U1.29@5010.71,3597.4
  Top Layer w12: P9.4@3842.77,2880 3793.77,2929 3727.66,2929 3690.66,2966 3690.66,3286 3797.66,3393 v1(3909,3393)
  Bottom Layer w10: 4578.5,3427.5 4653,3502 4765,3502 4846.49,3583.49 v1(4938.89,3583.49)
  Bottom Layer w12: v1(3909,3393) 4544,3393 4578.5,3427.5
  Bottom Layer w25: P9.4@3845,2880 3845.5,2879.5 C119.1@3929.25,2879.5 3929,2879.75 R27.1@3929,2925.5
ACT10: C120.1 P10.4 R29.1 U1.30 | length 2385.9
  Top Layer w10: v1(4938.89,3631) 4952.8,3617.09 U1.30@5010.71,3617.09
  Top Layer w12: v1(3394,3262) 3379,3247 3379,2970 3420,2929 3477.11,2929 P10.4@3526.11,2880
  Bottom Layer w10: 4581.92,3468.92 4635,3522 4757,3522 4866,3631 v1(4938.89,3631)
  Bottom Layer w12: v1(3394,3262) 3442,3310 3637,3310 3746,3419 4532,3419 4581.92,3468.92
  Bottom Layer w25: P10.4@3528.89,2880 3529.39,2879.5 C120.1@3611.64,2879.5 R29.1@3611.64,2924.5
BLED1: P1.2 R12.1 | length 82.9
  Bottom Layer w25: P1.2@6336.11,3080 R12.1@6419,3080
BLED2: P3.2 R14.1 | length 85
  Bottom Layer w25: P3.2@6033.33,3080 R14.1@6118.33,3080
BLED3: P5.2 R16.1 | length 86
  Bottom Layer w25: P5.2@5720.56,3080 R16.1@5806.56,3080
BLED4: P7.2 R18.1 | length 86
  Bottom Layer w25: P7.2@5412.78,3080 R18.1@5498.78,3080
BLED5: P2.2 R20.1 | length 85
  Bottom Layer w25: P2.2@5100,3080 R20.1@5185,3080
BLED6: P4.2 R22.1 | length 84.8
  Bottom Layer w25: P4.2@4782.22,3080 4784.22,3078 R22.1@4866.22,3078
BLED7: P6.2 R24.1 | length 86.8
  Bottom Layer w25: P6.2@4464.44,3080 4466.44,3078 R24.1@4550.44,3078
BLED8: P8.2 R26.1 | length 87.8
  Bottom Layer w12: R26.1@4241.67,3079 R26.1@4242.67,3078
  Bottom Layer w25: P8.2@4156.67,3080 4157.67,3079 4241.67,3079 R26.1@4242.67,3079
BLED9: P9.2 R28.1 | length 84
  Bottom Layer w25: P9.2@3845,3080 R28.1@3929,3080
BLED10: P10.2 R30.1 | length 83.8
  Bottom Layer w25: P10.2@3528.89,3080 3530.89,3078 R30.1@3611.89,3078
BOOT0#: SWB1.2 U1.44 | length 830.3
  Top Layer w10: v1(4800.52,3986) 4800.52,3871.48 4815.83,3856.17 U1.44@4815.83,3792.28
  Bottom Layer w20: SWB1.2@4761.26,4600 4761.26,4088.74 4800.52,4049.48 v1(4800.52,3986)
BUZZ: Rb.2 U1.31 | length 2040.9
  Top Layer w8: U1.31@5010.71,3636.77 5038.23,3636.77 5075,3600 5110,3600 5175.81,3665.81 5498.19,3665.81 v1(5519,3645) ; v1(5379,3726) 5380,3727 v1(5380,3815) ; v1(5465,3814) 5465,3724 5473.49,3715.51 5841.51,3715.51 v1(5848,3722)
  Bottom Layer w8: v1(5379,3726) 5379,3652 5399,3632 5438,3632 5456,3614 5500,3614 5519,3633 v1(5519,3645) ; v1(5380,3815) 5381,3814 v1(5465,3814) ; v1(5848,3722) 6141,4015 Rb.2@6304.5,4015
CHG: LED3.2 U3.3 | length 1169.3
  Top Layer w12: LED3.2@3577.48,3420.5 3659.5,3420.5 v1(3800,3561) ; U3.3@3847.02,4098.4 4016.6,4098.4 4054,4061 v1(4054,3980)
  Bottom Layer w12: v1(3800,3561) 3904,3561 4054,3711 v1(4054,3980)
DM: SB2.2 SB4.2 SB_2.2 SB_4.2 U1.32 | length 2837.7
  Top Layer w10: v1(4895.66,3741.2) 4895.66,3700.34 4939.54,3656.46 U1.32@5010.71,3656.46 5044.54,3656.46 5080,3621 5103,3621 5160.81,3678.81 6036.19,3678.81 6063,3652 SB4.2@6063,3624 6063,3537 6103,3497 6103,3427 6083,3407 5945,3407 5926,3388 SB_4.2@5926,3354
  Top Layer w12: SB2.2@4011,3863 v1(4230,3863) 4311,3863 SB_2.2@4314,3860
  Bottom Layer w10: v1(4230,3863) 4236,3863 4299,3926 4745.6,3926 4895.66,3775.93 v1(4895.66,3741.2)
DM#: CF1.1 RF1.1 SB4.1 SB_4.1 | length 492.7
  Top Layer w12: SB_4.1@6026,3354 6112,3354 6131,3373 6131,3523 v1(6088,3566) 6123,3601 SB4.1@6123,3624
  Bottom Layer w12: v1(6088,3566) RF1.1@6088,3623
  Bottom Layer w25: CF1.1@6048.5,3623 CF1.1@6049,3623 RF1.1@6088,3623
DM_: C23.1 R51.1 SB2.1 SB_2.1 | length 1020.8
  Top Layer w12: v1@3953,3905 v1(3953,3902) 3953,3865 SB2.1@3951,3863 3951,3834 3969,3816 4331.44,3816 4375.44,3860 SB_2.1@4414,3860
  Bottom Layer w12: R51.1@3561.5,3782 3601.5,3782 C23.1@3604.5,3785 3604.5,3817.5 v1(3623,3836) 3689,3902 v1(3953,3902)
DP: SB3.2 SB5.2 SB_3.2 SB_5.2 U1.33 | length 3286.1
  Top Layer w10: U1.33@5010.71,3676.14 5058.86,3676.14 v1(5090,3645) 5141,3696 5987,3696 ; v1(5969,3746) 5969,3714 5987,3696 ; SB5.2@6063,3700 6059,3696 5987,3696
  Top Layer w12: SB3.2@4011,3652 4011,3543 4072,3482 ; v1(4207,3271) 4208,3346 4072,3482 ; SB_3.2@4224,3482 4072,3482
  Bottom Layer w10: v1(4207,3271) 5046,3271 5090,3315 v1(5090,3645) ; SB_5.2@5926,3469 5969,3512 v1(5969,3746)
DP#: CF2.1 RF2.1 SB5.1 SB_5.1 | length 850.7
  Top Layer w12: v1(6088,3758) 6123,3723 SB5.1@6123,3700
  Bottom Layer w12: SB_5.1@6026,3469 6247,3469 6271,3493 6271,3726 6248,3749 6176,3749 6167,3758 v1(6088,3758) RF2.1@6088,3701
  Bottom Layer w25: CF2.1@6051,3701 RF2.1@6088,3701
DP_: C24.1 R52.1 SB3.1 SB_3.1 | length 1013.8
  Top Layer w12: v1(3910,3652) SB3.1@3951,3652 3951,3542 4040,3453 v1(4041,3453)
  Bottom Layer w12: R52.1@3561.5,3738 3598.5,3738 C24.1@3603.5,3733 3603.5,3695.5 v1(3621,3678) 3647,3652 v1(3910,3652) ; v1(4041,3453) 4059,3435 4311,3435 4324,3448 SB_3.1@4324,3482

## Text inside footprints (layer, text, board x,y; h text height)
SWB1: Top Overlay "PCB Edge" at 4677.52,4655 h23.62